# Altium PCB PCI Express Mini_3000X5095_52PIN_Full-Mini-Type F1.PCBDOC (part 2 of 8)
Units mm, origin at the board's own origin, x right, y up, seen from the top; angles counter-clockwise.
Board outline 70 x 83.2 mm, 6 copper layers (TopLayer, Layer 1, Layer 2, Layer 3, Layer 4, Bottom Layer), stack 0.914 mm thick; 380 components, 252 nets, 1258 pads, 603 vias.
Unrouted connection lines stored in the file: 10.
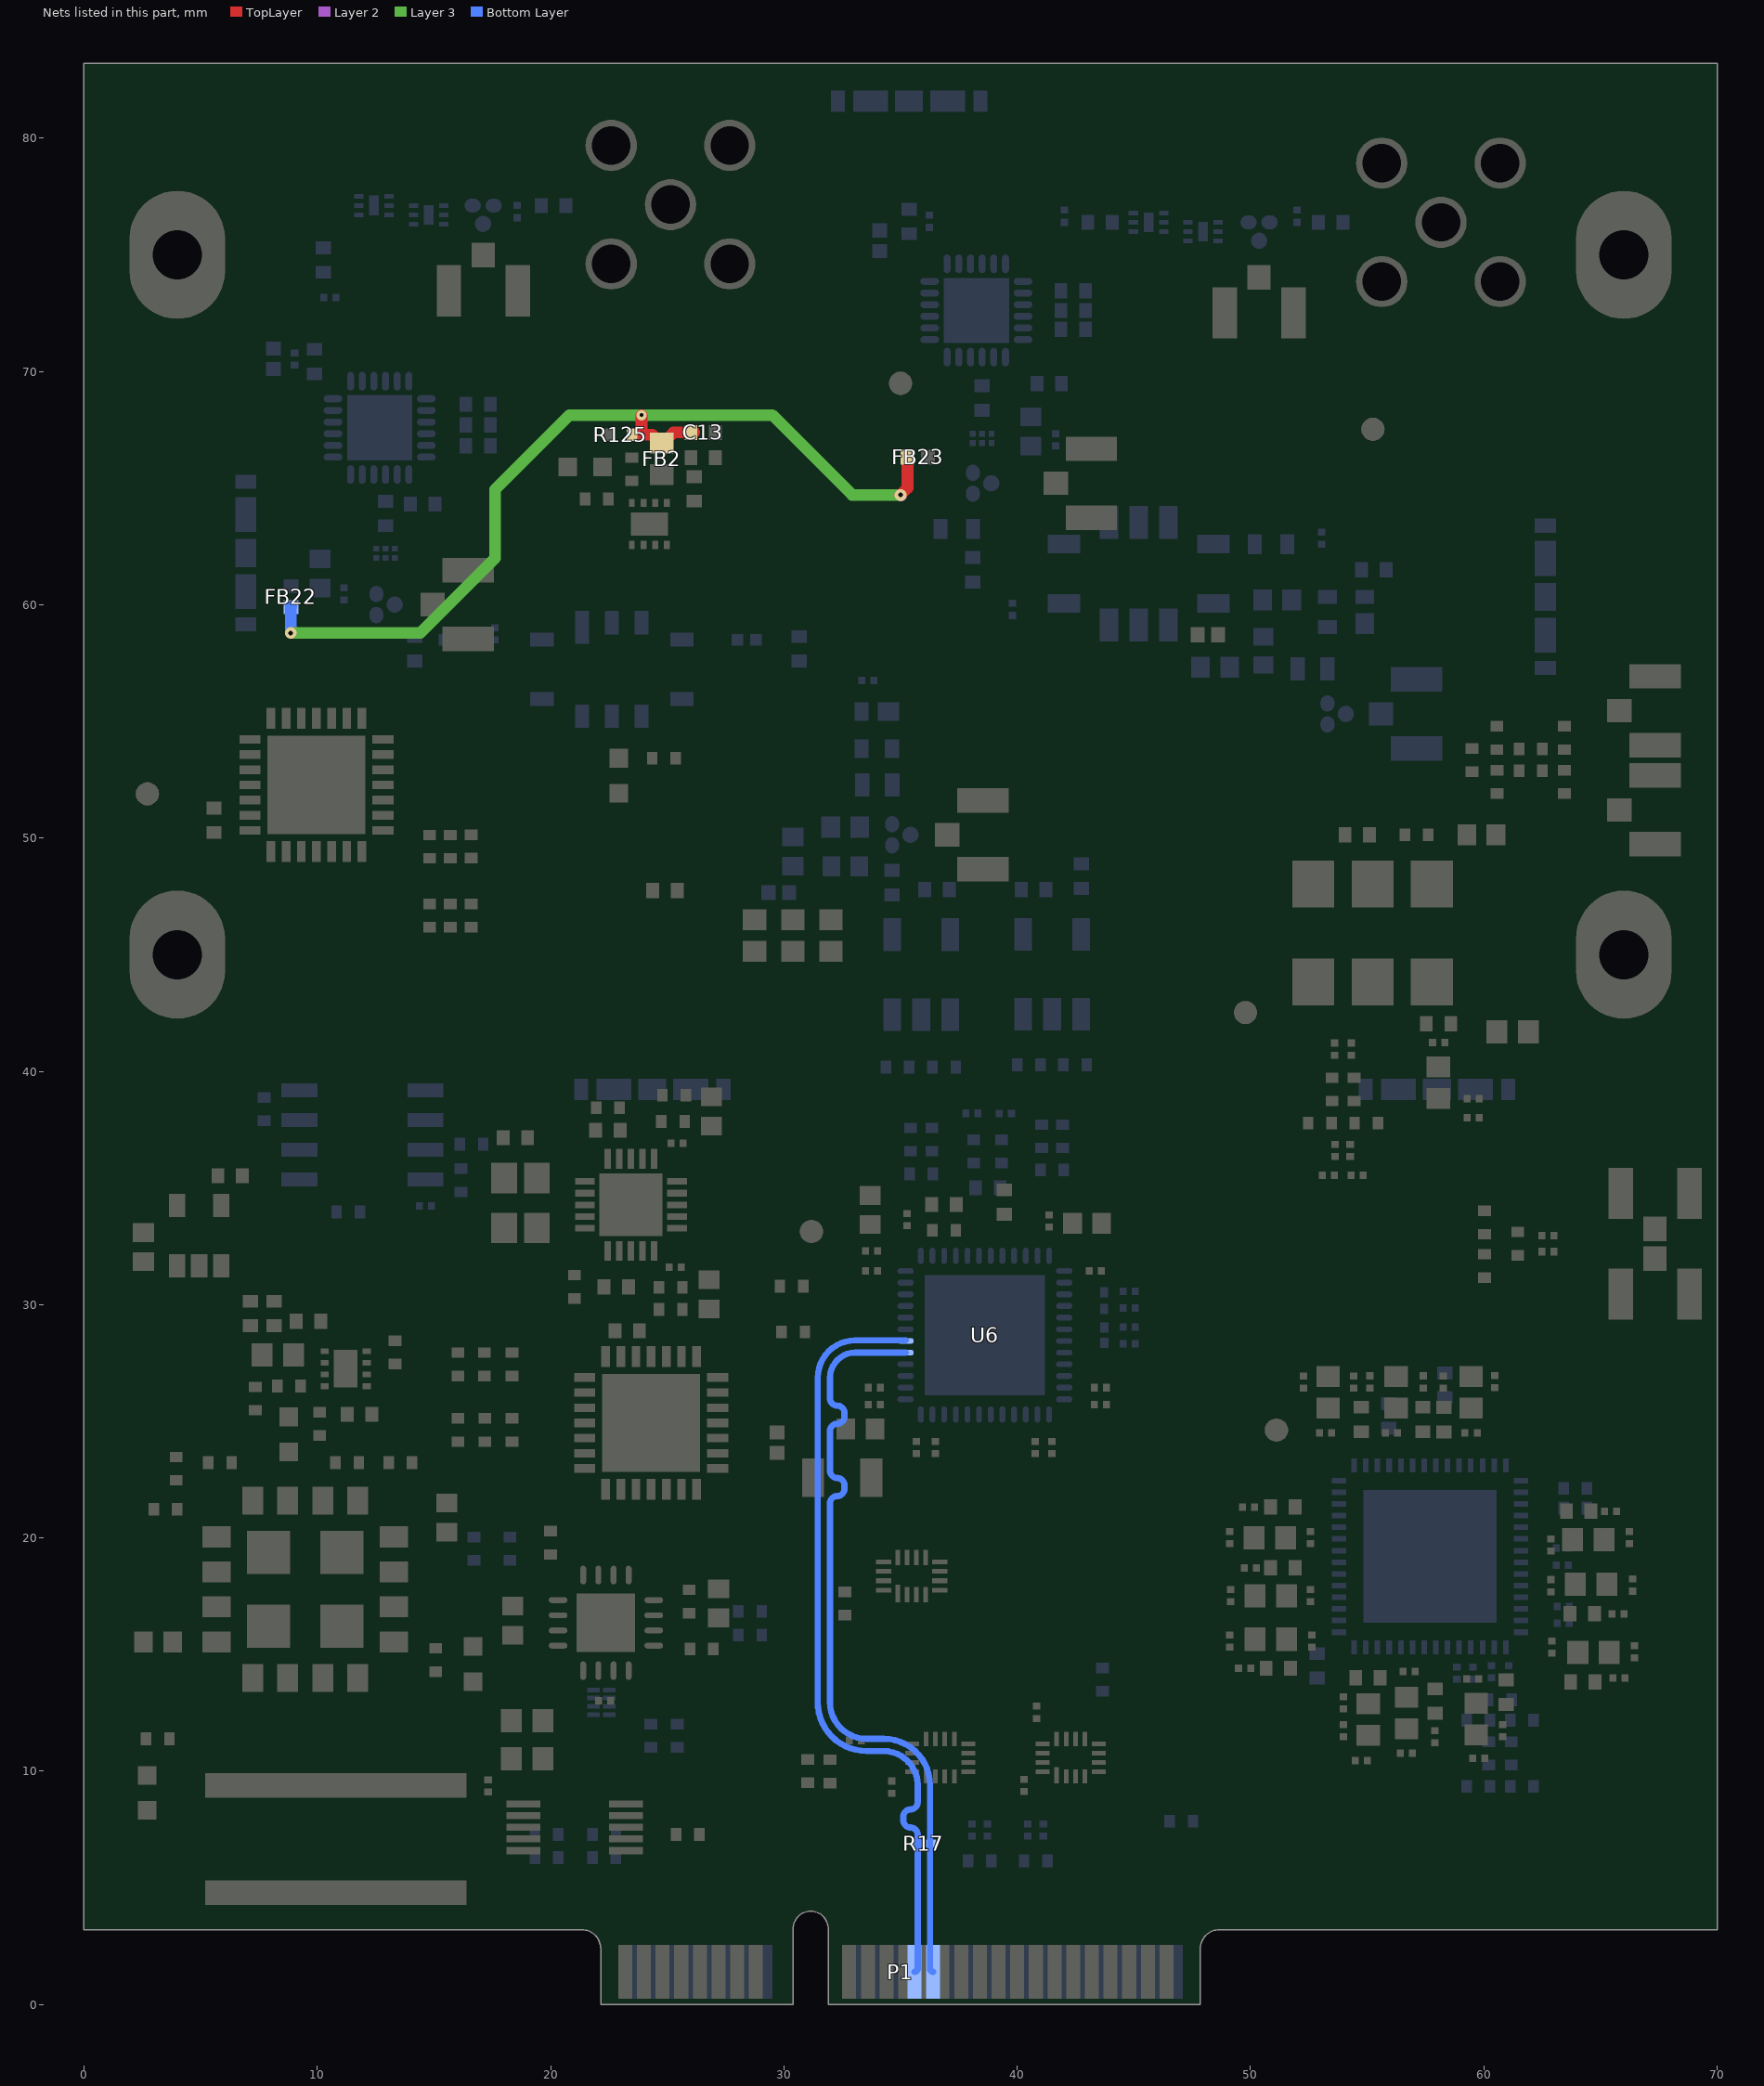
[diagram p6: the nets of this part, all layers, seen from the top]

## Footprints (in the part's own frame and the unit in brackets; to place one, negate y for a bottom-side part, rotate by r counter-clockwise, add the part's x,y. Pads: shape width x height; smd on the part's side, far side on the other; paste and mask are expansions set on the pad) (continued)
LTC2122 [mm] "LTC2122, QFN, 48-Leads, Body 7,00x7,00mm, Pitch 0,50mm, Thermal Pad 5,15x5,15mm, IPC Medium Density"
  oval 0.7x0.25 smd: 1(-3.4,2.75) 2(-3.4,2.25) 3(-3.4,1.75) 4(-3.4,1.25) 5(-3.4,0.75) 6(-3.4,0.25) 7(-3.4,-0.25) 8(-3.4,-0.75) 9(-3.4,-1.25) 10(-3.4,-1.75) 11(-3.4,-2.25) 12(-3.4,-2.75) 25(3.4,-2.75) 26(3.4,-2.25) 27(3.4,-1.75) 28(3.4,-1.25) 29(3.4,-0.75) 30(3.4,-0.25) 31(3.4,0.25) 32(3.4,0.75) 33(3.4,1.25) 34(3.4,1.75) 35(3.4,2.25) 36(3.4,2.75)
  oval 0.25x0.7 smd: 13(-2.75,-3.4) 14(-2.25,-3.4) 15(-1.75,-3.4) 16(-1.25,-3.4) 17(-0.75,-3.4) 18(-0.25,-3.4) 19(0.25,-3.4) 20(0.75,-3.4) 21(1.25,-3.4) 22(1.75,-3.4) 23(2.25,-3.4) 24(2.75,-3.4) 37(2.75,3.4) 38(2.25,3.4) 39(1.75,3.4) 40(1.25,3.4) 41(0.75,3.4) 42(0.25,3.4) 43(-0.25,3.4) 44(-0.75,3.4) 45(-1.25,3.4) 46(-1.75,3.4) 47(-2.25,3.4) 48(-2.75,3.4)
  rect 5.15x5.15 smd: 49(0,0)
  silkscreen extent -4.42,-3.65 3.65,3.65, body extent -3.7,-3.7 3.7,3.7, height 0.8
MABA-007159-000000 [mm]
  rect 1.4x0.76 smd: 1(-1.715,-1.25) 2(-1.715,0) 3(-1.715,1.25) 4(1.715,1.25) 5(1.715,-1.25)
  silkscreen extent -2.92,-2.03 2.79,1.9, body extent -2.69,-1.9 2.69,1.9, height 3.24
MCP23017/MCP23S17 [mm] "QFN, 28-Leads, Body 6,00x6,00mm, Pitch 0,65mm, Thermal Pad 4,25x4,25mm, IPC High Density"
  rect 0.9x0.37 smd: 1(-2.85,1.95) 2(-2.85,1.3) 3(-2.85,0.65) 4(-2.85,0) 5(-2.85,-0.65) 6(-2.85,-1.3) 7(-2.85,-1.95) 15(2.85,-1.95) 16(2.85,-1.3) 17(2.85,-0.65) 18(2.85,0) 19(2.85,0.65) 20(2.85,1.3) 21(2.85,1.95)
  rect 0.37x0.9 smd: 8(-1.95,-2.85) 9(-1.3,-2.85) 10(-0.65,-2.85) 11(0,-2.85) 12(0.65,-2.85) 13(1.3,-2.85) 14(1.95,-2.85) 22(1.95,2.85) 23(1.3,2.85) 24(0.65,2.85) 25(0,2.85) 26(-0.65,2.85) 27(-1.3,2.85) 28(-1.95,2.85)
  rect 4.2x4.2 smd: 29(0,0)
  silkscreen extent -3.92,-3.15 3.15,3.15, body extent -3,-3 3,3, height 1
ODS-1415 [mm]
  rect 0.4x0.2 smd: 1(-0.65,0.4) 2(-0.65,0) 3(-0.65,-0.4) 4(0.65,-0.4) 5(0.65,0) 6(0.65,0.4)
  rect 0.42x0.85 smd: 7(0,0)
  silkscreen extent -1.11,0.66 -1.01,0.76, body extent -0.75,-0.6 0.75,0.6, height 0.6
PCA9306 [mm] "8-XFDFN, Body 1,40x1,00mm, Pitch 0,35mm, IPC High Density"
  rect 0.53x0.2 smd: 1(-0.335,0.525) 2(-0.335,0.175) 3(-0.335,-0.175) 4(-0.335,-0.525) 5(0.335,-0.525) 6(0.335,-0.175) 7(0.335,0.175) 8(0.335,0.525)
  silkscreen extent -0.86,0.79 -0.76,0.89, body extent -0.53,-0.72 0.53,0.72, height 0.4
PCIeMini-GF-2D-800-1K-S52 [mm] "Golden finger, PCIeMini, Dual, Staggered, Pitch 0.8mm, 52-Position"
  rect 0.6x2.3 smd paste-0.9: 1(-11.8,0) 3(-11,0) 5(-10.2,0) 7(-9.4,0) 9(-8.6,0) 11(-7.8,0) 13(-7,0) 15(-6.2,0) 17(-2.2,0) 19(-1.4,0) 21(-0.6,0) 23(0.2,0) 25(1,0) 27(1.8,0) 29(2.6,0) 31(3.4,0) 33(4.2,0) 35(5,0) 37(5.8,0) 39(6.6,0) 41(7.4,0) 43(8.2,0) 45(9,0) 47(9.8,0) 49(10.6,0) 51(11.4,0)
  rect 0.6x2.3 smd far side paste-0.9: 2(-11.4,0) 4(-10.6,0) 6(-9.8,0) 8(-9,0) 10(-8.2,0) 12(-7.4,0) 14(-6.6,0) 16(-5.8,0) 18(-1.8,0) 20(-1,0) 22(-0.2,0) 24(0.6,0) 26(1.4,0) 28(2.2,0) 30(3,0) 32(3.8,0) 34(4.6,0) 36(5.4,0) 38(6.2,0) 40(7,0) 42(7.8,0) 44(8.6,0) 46(9.4,0) 48(10.2,0) 50(11,0) 52(11.8,0)
QCC12B [mm] "Ceramic package QCC12B"
  rect 0.6x1.4 smd: 1(-1.27,-1.8)
  rect 0.6x1 smd: 2(0,-2) 3(1.27,-2) 7(1.27,2) 8(0,2) 9(-1.27,2)
  rect 1x0.6 smd: 4(3,-1.27) 6(3,1.27) 10(-3,1.27) 12(-3,-1.27)
  silkscreen extent -3.5,-3.17 3.5,2.5, body extent -3.5,-2.5 3.5,2.5, height 1.5
"RES 0201/0603"#1 [mm] "Chip Resistor, 2-Leads, Body 0.60x0.30mm, IPC Medium Density"
  rect 0.44x0.35 smd: 1(-0.325,0) 2(0.325,0)
  silkscreen extent -0.7,-0.33 0.7,0.33, body extent -0.3,-0.15 0.3,0.15, height 0.21
"RES 0201/0603"#2 [mm] "Chip Resistor, 2-Leads, Body 0.60x0.30mm, IPC Medium Density"
  rect 0.44x0.35 smd: 1(-0.325,0) 2(0.394,0)
  silkscreen extent -0.7,-0.33 0.7,0.33, body extent -0.3,-0.15 0.3,0.15, height 0.21
"RES 0402/1005 RF - 3-PADS" [mm] "Chip Resistor, 2-Leads, Body 1.0x0.5mm, IPC High Density"
  oval 0.7x0.6 smd: 1(-0.45,0) 2(0.45,0)
  round 0.7 smd: 3(0,0.787)
  silkscreen extent -1.02,-0.5 1.02,1.34, body extent -0.5,-0.25 0.5,0.25, height 0.35
"RES 0402/1005 RF KK" [mm] "Chip Resistor, 2-Leads, Body 1.0x0.5mm, IPC High Density"
  rect 0.45x0.55 smd: 1(-0.5,0) 2(0.5,0)
  silkscreen extent -1.02,-0.51 1.02,0.51, body extent -0.5,-0.25 0.5,0.25, height 0.35
"RES 0603/1608 RF" [mm]
  rect 0.75x0.85 smd: 1(-0.6,0) 2(0.6,0)
  silkscreen extent -1.2,-0.6 1.2,0.6, body extent -0.8,-0.4 0.8,0.4, height 0.45
ROS-32K101-400L5_V [mm] "SMA Straight Jack, 6.35x6.35x9.5mm, Rosenberger Recommended"
  round 2.2 hole 1.65: 1(0,0) MH(-2.54,2.54) MH(-2.54,-2.54) MH(2.54,2.54) MH(2.54,-2.54)
  silkscreen extent -3.17,-3.18 3.18,3.17, body extent -3.17,-3.17 3.18,3.18, height 9.5
TB0787A [mm] "TB0787A MP02661"
  rect 0.8x1.4 smd: A(-1.27,-2.2) B(0,-2.2) C(1.27,-2.2) F(1.27,2.2) G(0,2.2) H(-1.27,2.2)
  rect 1.4x0.8 smd: D(3.2,-1.27) E(3.2,1.27) J(-3.2,1.27) K(-3.2,-1.27)
  silkscreen extent -3.6,-3.55 3.6,2.6, body extent -3.5,-2.5 3.5,2.5, height 1.7
TECO-1909763-1_V [mm] "SMD, 3-Leads, Body 2.6x2.6mm, Height 1.25mm"
  rect 1.05x2.2 smd: 1(-1.475,0) 3(1.475,0)
  rect 1x1.05 smd: 2(0,-1.525)
  silkscreen extent -1.9,-1.77 0.55,1.3, body extent -1.5,-1.55 1.5,1.55, height 1.25
TPS7A88 [mm] "RTJ (S-PWQFN-N20) 20-Leads, Body 4,00x4,00mm, Pitch 0,50mm, Thermal Pad 2,70x2,70mm, IPC High Density"
  rect 0.85x0.28 smd: 1(-1.975,1) 2(-1.975,0.5) 3(-1.975,0) 4(-1.975,-0.5) 5(-1.975,-1) 11(1.975,-1) 12(1.975,-0.5) 13(1.975,0) 14(1.975,0.5) 15(1.975,1)
  rect 0.28x0.85 smd: 6(-1,-1.975) 7(-0.5,-1.975) 8(0,-1.975) 9(0.5,-1.975) 10(1,-1.975) 16(1,1.975) 17(0.5,1.975) 18(0,1.975) 19(-0.5,1.975) 20(-1,1.975)
  rect 2.7x2.7 smd paste-3: 21(0,0)
  silkscreen extent -2.85,-2.07 2.07,2.07, body extent -2.07,-2.07 2.07,2.07, height 0.8
TSNP-6-10-FP [mm]
  rect 0.25x0.25 smd: 1(-0.2,0.4) 2(-0.2,0) 3(-0.2,-0.4) 4(0.2,-0.4) 5(0.2,0) 6(0.2,0.4)
  silkscreen extent -0.39,0.8 -0.29,0.9, body extent -0.4,-0.55 0.4,0.55, height 0.37
TXB0304 [mm] "RSV0016A UQFN - 0.55 mm max height"
  rect 0.75x0.2 smd: 1(-0.75,0.6)
  rect 0.65x0.2 smd: 2(-0.8,0.2) 3(-0.8,-0.2) 4(-0.8,-0.6) 9(0.8,-0.6) 10(0.8,-0.2) 11(0.8,0.2) 12(0.8,0.6)
  rect 0.2x0.65 smd: 5(-0.6,-1.2) 6(-0.2,-1.2) 7(0.2,-1.2) 8(0.6,-1.2) 13(0.6,1.2) 14(0.2,1.2) 15(-0.2,1.2) 16(-0.6,1.2)
  silkscreen extent -1.27,1.58 -1.18,1.67, body extent -0.92,-1.33 0.92,1.33, height 0.55
VG-4513CA [mm] "VG-4513CA, Concave, 6-Leads, Pitch 2,54mm,  Body 7,00x5,00mm,  IPC Medium Density"
  rect 2x1.8 smd: 1(-2.1,2.54) 2(-2.1,0) 3(-2.1,-2.54) 4(2.1,-2.54) 5(2.1,0) 6(2.1,2.54)
  silkscreen extent -3.26,3.28 -3.16,3.38, body extent -2.55,-3.5 2.55,3.5, height 1.6
WE-KI_0603 [mm] "SMD Wire Wound Ceramic Inductor, body 1.6x1.05mm"
  rect 0.625x1 smd: 1(-0.637,0) 2(0.637,0)
  body extent -0.82,-0.58 0.83,0.58, height 0.92

## Part data
C1 C2 C38 C75 C76 C91: library part Capacitor, "TAIYO YUDEN - EMK107ABJ475MA-T - SMD Multilayer Ceramic Capacitor, 4.7 µF, 16 V, 0603 [1608 Metric], ± 20%, X5R, M Series", Case/Package=Ceramic, Dielectric=X5R, Manufacturer="Taiyo Yuden", Manufacturer Part Number=EMK107ABJ475MA-T, Max Operating Temperature=85°C, Min Operating Temperature=-55°C, Supplier Part Number 1=587-6003-1-ND, Tolerance=20%, Voltage=16V, Capacitance=4.7uF, Category="Ceramic Capacitors", ComponentLink1Description=https://datasheet.ciiva.com/26871/getdatasheetpartid-637315-26871304.pdf?src-supplier=Verical, ComponentLink1URL=https://datasheet.ciiva.com/26871/getdatasheetpartid-637315-26871304.pdf?src-supplier=Verical, Depth=0.8mm, Height=0.8mm, Lead Free="Lead Free", Length=1.6mm, Mount="Surface Mount", Packaging="Tape and Reel", Pricing 1="1=0,28000, 10=0,19200, 50=0,12820, 100=0,10900, 500=0,07696, 1000=0,06734 (USD)", Radiation Hardening=No, RoHS=Yes, Stock 1=5, Supplier 1=Digi-Key
C3: library part Capacitor, Case Code (Imperial)=0603, Case Code (Metric)=1608, Dielectric=X5R, Manufacturer 1=Samsung, Manufacturer Part Number 1=CL10A105KA8NNNC, Max Operating Temperature=85°C, Min Operating Temperature=-55°C, Package Quantity=1, Supplier Part Number 1=1276-1102-1-ND, Tolerance=10%, Voltage=25V, Capacitance=1uF, Case/Package=0603, ComponentLink1Description=https://datasheet.ciiva.com/25801/cl10a105ka8nnnc-25801364.pdf?src-supplier=Digi-Key, ComponentLink1URL=https://datasheet.ciiva.com/25801/cl10a105ka8nnnc-25801364.pdf?src-supplier=Digi-Key, ComponentLink2Description=https://datasheet.ciiva.com/26838/getdatasheetpartid-357530-26838332.pdf?src-supplier=Verical, ComponentLink2URL=https://datasheet.ciiva.com/26838/getdatasheetpartid-357530-26838332.pdf?src-supplier=Verical, ComponentLink3Description=https://datasheet.ciiva.com/29198/458162-da-01-en-vs-kondensator-0603-29198475.pdf?src-supplier=Conrad, ComponentLink3URL=https://datasheet.ciiva.com/29198/458162-da-01-en-vs-kondensator-0603-29198475.pdf?src-supplier=Conrad, Contact Plating=Tin, Depth=0.8mm, Height=0.8mm, Lead Free="Lead Free", Length=1.6mm, Material=Ceramic, Mount="Surface Mount", Packaging="Tape and Reel", Pricing 1="1=0.10000, 10=0.04100, 100=0.01850, 500=0.01320, 1000=0.01037 (USD)", Radiation Hardening=No, RoHS=Yes, Stock 1=3421596, Supplier 1=Digi-Key, Thickness=0.035inch, Voltage Rating=25V, Voltage Rating (DC)=25V, Width=0.031inch
C4 C65 C73 C74: library part Capacitor, "MURATA - GRM155R61A225KE95D - Keramikvielschichtkondensator, SMD, 2.2 µF, 10 V, 0402 [Metrisch 1005], ± 10%, X5R, Baureihe GRM", Case Code (Imperial)=0402, Case Code (Metric)=1005, Dielectric=X5R, Manufacturer=Murata, Manufacturer Part Number=GRM155R61A225KE95D, Max Operating Temperature=85°C, Min Operating Temperature=-55°C, Package Quantity=10000, Supplier Part Number 1=490-10451-1-ND, Tolerance=10%, Voltage Rating=10V, Capacitance=2.2uF, Case/Package=0402, Category="Ceramic Capacitors", ComponentLink1Description=http://www.mouser.com/ds/2/281/c02e-2905.pdf?src-supplier=Mouser, ComponentLink1URL=http://www.mouser.com/ds/2/281/c02e-2905.pdf?src-supplier=Mouser, ComponentLink2Description=http://components.arrow.com/part/dataview/0323_04264073?src-supplier=Arrow+Europe, ComponentLink2URL=http://components.arrow.com/part/dataview/0323_04264073?src-supplier=Arrow+Europe, ComponentLink3Description=http://www.farnell.com/datasheets/1872202.pdf?src-supplier=Farnell, ComponentLink3URL=http://www.farnell.com/datasheets/1872202.pdf?src-supplier=Farnell, ComponentLink4Description=http://www.farnell.com/datasheets/2047915.pdf?src-supplier=Farnell, ComponentLink4URL=http://www.farnell.com/datasheets/2047915.pdf?src-supplier=Farnell, ComponentLink5Description=http://www.farnell.com/datasheets/1872202.pdf?src-supplier=Element14, ComponentLink5URL=http://www.farnell.com/datasheets/1872202.pdf?src-supplier=Element14, ComponentLink6Description=http://www.farnell.com/datasheets/1872202.pdf?src-supplier=Newark, ComponentLink6URL=http://www.farnell.com/datasheets/1872202.pdf?src-supplier=Newark, ComponentLink7Description=http://psearch.en.murata.com/capacitor/product/GRM155R61A225KE95%23.pdf?src-supplier=Avnet, ComponentLink7URL=http://psearch.en.murata.com/capacitor/product/GRM155R61A225KE95%23.pdf?src-supplier=Avnet, ComponentLink8Description=http://www.farnell.com/datasheets/2047915.pdf?src-supplier=Element14, ComponentLink8URL=http://www.farnell.com/datasheets/2047915.pdf?src-supplier=Element14, ComponentLink9Description=https://search.murata.co.jp/Ceramy/image/img/A01X/G101/ENG/GRM155R61A225KE95-01.pdf?src-supplier=Digi-Key, ComponentLink9URL=https://search.murata.co.jp/Ceramy/image/img/A01X/G101/ENG/GRM155R61A225KE95-01.pdf?src-supplier=Digi-Key, ComponentLink10Description=http://www.farnell.com/datasheets/2047915.pdf?src-supplier=Newark, ComponentLink10URL=http://www.farnell.com/datasheets/2047915.pdf?src-supplier=Newark, Depth=0.5mm, Height=0.5mm, Lead Free="Lead Free", Length=1mm, Material=Ceramic, Mount="Surface Mount", Packaging="Tape and Reel", REACH SVHC="No SVHC", RoHS=Yes, Supplier 1=Digi-Key, Termination=SMD/SMT, Thickness=0.022inch, Voltage Rating (DC)=10V, Weight=0.000212oz, Width=0.5mm
  C4: Pricing 1="1=0,11000, 10=0,07700, 50=0,04380, 100=0,03630, 500=0,02546, 1000=0,02108, 2500=0,01962, 5000=0,01795 (USD)", Stock 1=502318
  C65 C73 C74: Pricing 1="1=0,11000, 10=0,08100, 100=0,03800, 500=0,02664, 1000=0,02205, 2500=0,02052, 5000=0,01878 (USD)", Stock 1=2215146
C5 C42: library part Capacitor, Case Code (Imperial)=0402, Case Code (Metric)=1005, Dielectric=C0G, Dielectric Material=Ceramic, Manufacturer 1=KEMET, Manufacturer Part Number 1=C0402C101J5GACAUTO, Max Operating Temperature=125°C, Min Operating Temperature=-55°C, Package Quantity=10000, Ratings=AEC-Q200, Supplier Part Number 1=399-6823-1-ND, Tolerance=5%, Voltage Rating=50V, Capacitance=100pF, Case/Package=0402, ComponentLink1Description=https://datasheet.ciiva.com/26923/getdatasheetpartid-385375-26923866.pdf?src-supplier=Verical, ComponentLink1URL=https://datasheet.ciiva.com/26923/getdatasheetpartid-385375-26923866.pdf?src-supplier=Verical, Depth=0.5mm, Lead Free="Lead Free", Length=1mm, Mount="Surface Mount", Packaging="Tape and Reel", Pricing 1="1=0.11000, 10=0.08400, 100=0.03730, 500=0.02664, 1000=0.02093, 2500=0.01903, 5000=0.01751 (USD)", Radiation Hardening=No, REACH SVHC="No SVHC", RoHS=Yes, Stock 1=66452, Supplier 1=Digi-Key, Thickness=0.022inch, Voltage Rating (DC)=50V, Width=0.02inch
C6 C7 C10 C11 C67 C68: library part Capacitor, "MURATA - GRT155R61E105KE01D - SMD Multilayer Ceramic Capacitor, 1 µF, 25 V, 0402 [1005 Metric], ± 10%, X5R, GRT Series - SMD Multilayer Ceramic Capacitor, 1 µF, 25 V, 0402 [1005 Metric], ± 10%, X5R, GRT Series", Case Code (Imperial)=0402, Case Code (Metric)=1005, Dielectric=X5R, Manufacturer=Murata, Manufacturer Part Number=GRT155R61E105KE01D, Max Operating Temperature=85°C, Min Operating Temperature=-55°C, Ratings=AEC-Q200, Supplier Part Number 1=490-12263-1-ND, Tolerance=10%, Voltage Rating=25V, Capacitance=1uF, Case/Package=0402, Category="Ceramic Capacitors", ComponentLink1Description=http://www.farnell.com/datasheets/2165918.pdf?src-supplier=Farnell, ComponentLink1URL=http://www.farnell.com/datasheets/2165918.pdf?src-supplier=Farnell, ComponentLink2Description=http://search.murata.co.jp/Ceramy/image/img/A01X/G101/ENG/GRT155R61E105KE01-01.pdf?src-supplier=Digi-Key, ComponentLink2URL=http://search.murata.co.jp/Ceramy/image/img/A01X/G101/ENG/GRT155R61E105KE01-01.pdf?src-supplier=Digi-Key, ComponentLink3Description=http://www.farnell.com/datasheets/2165918.pdf?src-supplier=Element14, ComponentLink3URL=http://www.farnell.com/datasheets/2165918.pdf?src-supplier=Element14, Length=0.039inch, Mount="Surface Mount", Packaging="Tape and Reel", Pricing 1="1=0,18000, 10=0,12300, 100=0,06210, 500=0,04248, 1000=0,03758, 2500=0,03594, 5000=0,03268 (USD)", RoHS=Yes, Stock 1=341453, Supplier 1=Digi-Key, Thickness=0.022inch, Voltage Rating (DC)=25V, Width=0.02inch
C8 C9 C12 C13: library part Capacitor, Case Code (Imperial)=0402, Case Code (Metric)=1005, Manufacturer 1=Murata, Manufacturer Part Number 1=GRM155R61A475MEAAD, Max Operating Temperature=85°C, Min Operating Temperature=-55°C, Supplier Part Number 1=490-14306-1-ND, Tolerance=20%, Voltage Rating=10V, Capacitance=4.7uF, Case/Package=0402, ComponentLink1Description=http://www.farnell.com/datasheets/2189109.pdf?src-supplier=Farnell, ComponentLink1URL=http://www.farnell.com/datasheets/2189109.pdf?src-supplier=Farnell, ComponentLink2Description=https://search.murata.co.jp/Ceramy/image/img/A01X/G101/ENG/GRM155R61A475MEAA-01.pdf?src-supplier=Digi-Key, ComponentLink2URL=https://search.murata.co.jp/Ceramy/image/img/A01X/G101/ENG/GRM155R61A475MEAA-01.pdf?src-supplier=Digi-Key, ComponentLink3Description=http://datasheet.octopart.com/GRM155R61A475MEAAD-Murata-datasheet-68589269.pdf?src-supplier=Newark, ComponentLink3URL=http://datasheet.octopart.com/GRM155R61A475MEAAD-Murata-datasheet-68589269.pdf?src-supplier=Newark, ComponentLink4Description=http://datasheet.octopart.com/GRM155R61A475MEAAD-Murata-datasheet-8819587.pdf, ComponentLink4URL=http://datasheet.octopart.com/GRM155R61A475MEAAD-Murata-datasheet-8819587.pdf, ComponentLink5Description=http://datasheet.octopart.com/GRM155R61A475MEAAD-Murata-datasheet-10025737.pdf, ComponentLink5URL=http://datasheet.octopart.com/GRM155R61A475MEAAD-Murata-datasheet-10025737.pdf, ComponentLink6Description=http://datasheet.octopart.com/GRM155R61A475MEAAD-Murata-datasheet-11978611.pdf, ComponentLink6URL=http://datasheet.octopart.com/GRM155R61A475MEAAD-Murata-datasheet-11978611.pdf, ComponentLink7Description=http://datasheet.octopart.com/GRM155R61A475MEAAD-Murata-datasheet-12510076.pdf, ComponentLink7URL=http://datasheet.octopart.com/GRM155R61A475MEAAD-Murata-datasheet-12510076.pdf, ComponentLink8Description=http://datasheet.octopart.com/GRM155R61A475MEAAD-Murata-datasheet-12515295.pdf, ComponentLink8URL=http://datasheet.octopart.com/GRM155R61A475MEAAD-Murata-datasheet-12515295.pdf, Mount="Surface Mount", Packaging="Tape and Reel", Pricing 1="1=0.23000, 10=0.15400, 100=0.07780, 500=0.05322, 1000=0.04708, 2500=0.04504, 5000=0.04094 (USD)", Stock 1=1535315, Supplier 1=Digi-Key
C14 C15 C40 C41 C43 C44 C46 C47 C50 C51 C52 C53 C54 C55 C56 C57 C58 C59 C62 C66 C70 C71 C77 C78 C79 C80 C81 C82 C83 C84 C85 C88 C89 C90 C93 C94 C95 C97 C98 C99 C101 C102 C103 C105 C106 C107 C109 C110 C111 C113 C114 C115 C117 C118 C119 C121 C122 C123 C125 C126 C127 C131 C132 C133 C135 C136 C137 C143 C144 C145 C147 C148 C149 C153 C154 C166 C177 C179 C180_U_ATT1 C180_U_ATT2 C192 C193: library part Capacitor, Case Code (Imperial)=0201, Case Code (Metric)=0603, Dielectric=X5R, Manufacturer 1=Murata, Manufacturer Part Number 1=GRM033R61C104ME84D, Max Operating Temperature=85°C, Min Operating Temperature=-55°C, Package Quantity=15000, Supplier Part Number 1=490-9986-1-ND, Tolerance=20%, Voltage Rating=16V, Capacitance=100nF, Case/Package=0201, ComponentLink1Description=http://www.mouser.com/ds/2/281/c02e-2905.pdf?src-supplier=Mouser, ComponentLink1URL=http://www.mouser.com/ds/2/281/c02e-2905.pdf?src-supplier=Mouser, ComponentLink2Description=http://search.murata.co.jp/Ceramy/image/img/A01X/G101/ENG/GRM033R61C104ME84-01.pdf?src-supplier=Digi-Key, ComponentLink2URL=http://search.murata.co.jp/Ceramy/image/img/A01X/G101/ENG/GRM033R61C104ME84-01.pdf?src-supplier=Digi-Key, Height=0.3mm, Length=0.024inch, Mount="Surface Mount", Packaging="Tape and Reel", Pricing 1="1=0.10000, 10=0.05400, 100=0.02430, 500=0.01732, 1000=0.01361, 2500=0.01238, 5000=0.01139 (USD)", RoHS=Yes, Supplier 1=Digi-Key, Termination=SMD/SMT, Thickness=0.013inch, Voltage Rating (DC)=16V, Weight=1.2E-05oz, Width=0.3mm
  C14 C15 C40 C41 C43 C44 C46 C47 C50 C51 C52 C53 C54 C55 C56 C57 C58 C59 C62 C66 C70 C71 C77 C78 C79 C80 C81 C82 C83 C84 C85 C88 C89 C90 C93 C94 C95 C97 C98 C99 C101 C102 C103 C105 C106 C107 C109 C110 C111 C113 C114 C115 C117 C118 C119 C121 C122 C123 C125 C126 C127 C131 C132 C133 C135 C136 C137 C143 C144 C145 C147 C148 C149 C153 C154 C166 C177 C179 C192 C193: Stock 1=503570
  C180_U_ATT1 C180_U_ATT2: Stock 1=550070
C35 C36 C37 C96 C100 C104 C108 C112 C116 C120 C124 C128 C134 C138 C146 C150 C181_U_ATT1 C181_U_ATT2: library part Capacitor, "CAP CER 10UF 6.3V X5R 0402", Case Code (Imperial)=0402, Case Code (Metric)=1005, Manufacturer=Murata, Manufacturer Part Number=GRJ155R60J106ME11D, Max Operating Temperature=85°C, Min Operating Temperature=-55°C, Supplier Part Number 1=490-13211-1-ND, Tolerance=20%, Voltage Rating=6.3V, Capacitance=10uF, Case/Package=0402, Category="Ceramic Capacitors", ComponentLink1Description=http://psearch.en.murata.com/capacitor/product/GRJ155R60J106ME11%23.pdf?src-supplier=Digi-Key, ComponentLink1URL=http://psearch.en.murata.com/capacitor/product/GRJ155R60J106ME11%23.pdf?src-supplier=Digi-Key, Features="Soft Termination", Length=0.039inch, Mount="Surface Mount", Packaging="Cut Tape", Pricing 1="1=0,21000, 10=0,14500, 50=0,08680, 100=0,07330, 500=0,05016, 1000=0,04436, 2500=0,04244, 5000=0,03858 (USD)", RoHS=Yes, Stock 1=1136490, Supplier 1=Digi-Key, Thickness=0.028inch, Width=0.02inch
C39 C45: library part Capacitor, Case Code (Imperial)=0201, Case Code (Metric)=0603, Dielectric=X5R, Manufacturer 1=Yageo, Manufacturer Part Number 1=CC0201KRX5R6BB104, Max Operating Temperature=85°C, Min Operating Temperature=-55°C, Supplier Part Number 1=311-1593-1-ND, Tolerance=10%, Voltage Rating=10V, Capacitance=100nF, Case/Package=0201, ComponentLink1Description=https://datasheet.ciiva.com/17437/upy-gphc-x5r-4v-to-50v-12-17437495.pdf?src-supplier=Avnet+Europe, ComponentLink1URL=https://datasheet.ciiva.com/17437/upy-gphc-x5r-4v-to-50v-12-17437495.pdf?src-supplier=Avnet+Europe, ComponentLink2Description=https://datasheet.ciiva.com/11587/upy-gphc-x5r-4v-to-50v-12-11587190.pdf?src-supplier=Avnet, ComponentLink2URL=https://datasheet.ciiva.com/11587/upy-gphc-x5r-4v-to-50v-12-11587190.pdf?src-supplier=Avnet, Composition=Ceramic, Depth=0.3mm, Halogen Free="Halogen Free", Height=0.3mm, Lead Free="Lead Free", Length=0.6mm, Mount="Surface Mount", Packaging="Tape and Reel", Pricing 1="1=0.10000, 10=0.03800, 100=0.01690, 500=0.01208, 1000=0.00949, 2500=0.00862, 5000=0.00794 (USD)", Radiation Hardening=No, RoHS=Yes, Stock 1=1229391, Supplier 1=Digi-Key, Termination=SMD/SMT, Thickness=0.013inch, Voltage Rating (DC)=10V, Weight=6E-06oz, Width=0.012inch
C48: library part Capacitor, "0402 16V X7R 0.1uF 5% multilayer ceramic capacitor", Case/Package=0402, Dielectric=X7R, Manufacturer=Murata, Manufacturer Part Number=GCM155R71C104JA55D, Max Operating Temperature=125°C, Min Operating Temperature=-55°C, Supplier Part Number 1=490-16433-1-ND, Tolerance=5%, Capacitance=100nF, Category="Ceramic Capacitors", ComponentLink1Description=http://components.arrow.com/part/dataview/0323_06691671?src-supplier=Arrow+Europe, ComponentLink1URL=http://components.arrow.com/part/dataview/0323_06691671?src-supplier=Arrow+Europe, ComponentLink2Description=http://search.murata.co.jp/Ceramy/image/img/A01X/G101/ENG/GCM155R71C104JA55-01.pdf?src-supplier=Digi-Key, ComponentLink2URL=http://search.murata.co.jp/Ceramy/image/img/A01X/G101/ENG/GCM155R71C104JA55-01.pdf?src-supplier=Digi-Key, ComponentLink3Description=https://search.murata.co.jp/Ceramy/image/img/A01X/G101/ENG/GCM155R71C104JA55-01.pdf?src-supplier=Digi-Key, ComponentLink3URL=https://search.murata.co.jp/Ceramy/image/img/A01X/G101/ENG/GCM155R71C104JA55-01.pdf?src-supplier=Digi-Key, Depth=0.5mm, Length=1mm, Packaging="Tape and Reel", Pricing 1="1=0,10000, 10=0,05500, 50=0,02980, 100=0,02430, 500=0,01734, 1000=0,01363, 2500=0,01239, 5000=0,01140 (USD)", RoHS=Yes, Stock 1=306728, Supplier 1=Digi-Key
C49: library part Capacitor, "CAP CER 0.068UF 16V X7R 0402", Case/Package=0402, Manufacturer=Yageo, Manufacturer Part Number=AC0402KRX7R7BB683, Max Operating Temperature=125°C, Min Operating Temperature=-55°C, Ratings=AEC-Q200, Supplier Part Number 1=311-3269-1-ND, Tolerance=10%, Voltage Rating=16V, Capacitance=68nF, Category="Ceramic Capacitors", ComponentLink1Description=http://www.yageo.com/documents/recent/UPY-AC_NP0X7R_16V-to-630V_12.pdf?src-supplier=Digi-Key, ComponentLink1URL=http://www.yageo.com/documents/recent/UPY-AC_NP0X7R_16V-to-630V_12.pdf?src-supplier=Digi-Key, ComponentLink2Description=http://www.yageo.com/documents/recent/UPY-AC_NP0X7R_16V-to-630V_11.pdf?src-supplier=Digi-Key, ComponentLink2URL=http://www.yageo.com/documents/recent/UPY-AC_NP0X7R_16V-to-630V_11.pdf?src-supplier=Digi-Key, Lead Free="Lead Free", Mount="Surface Mount", Packaging="Cut Tape", Pricing 1="1=0,10000, 10=0,06000, 50=0,03260, 100=0,02650, 500=0,01896, 1000=0,01490, 2500=0,01354, 5000=0,01246 (USD)", RoHS=No, Stock 1=93171, Supplier 1=Digi-Key
C60 C61 C63 C64 C92: library part Capacitor, "Cap Ceramic 0.001uF 25V X7R 10% SMD 0201 125°C Paper T/R", Case Code (Imperial)=0201, Case Code (Metric)=0603, Dielectric=X7R, Manufacturer=Murata, Manufacturer Part Number=GRM033R71E102KA01J, Max Operating Temperature=125°C, Min Operating Temperature=-55°C, Package Quantity=50000, Supplier Part Number 1=490-8161-1-ND, Tolerance=10%, Voltage Rating=25V, Capacitance=1nF, Case/Package=0201, Category="Ceramic Capacitors", ComponentLink1Description=https://datasheet.ciiva.com/5453/product-5453157.pdf?src-supplier=Mouser, ComponentLink1URL=https://datasheet.ciiva.com/5453/product-5453157.pdf?src-supplier=Mouser, ComponentLink2Description=https://datasheet.ciiva.com/11621/product-11621675.pdf?src-supplier=Avnet, ComponentLink2URL=https://datasheet.ciiva.com/11621/product-11621675.pdf?src-supplier=Avnet, Depth=0.3mm, Height=0.3mm, Length=0.6mm, Mount="Surface Mount", Packaging="Tape and Reel", Pricing 1="1=0,10000, 10=0,02900, 100=0,01300, 500=0,00932, 1000=0,00732, 2500=0,00666, 5000=0,00612 (USD)", Radiation Hardening=No, RoHS=Yes, Stock 1=140332, Supplier 1=Digi-Key, Termination=SMD/SMT, Thickness=0.013inch, Voltage Rating (DC)=25V, Width=0.012inch
C86 C87 C129 C141: library part Capacitor, "0603 10 uF 16 V ±10% Tolerance X5R Multilayer Ceramic Capacitor", Case Code (Imperial)=0603, Case Code (Metric)=1608, Dielectric=X5R, Manufacturer=Murata, Manufacturer Part Number=GRM188R61C106KAALJ, Max Operating Temperature=85°C, Min Operating Temperature=-55°C, Package Quantity=10000, Supplier Part Number 1=490-12736-1-ND, Tolerance=10%, Voltage Rating=16V, Capacitance=10uF, Case/Package=0603, Category="Ceramic Capacitors", ComponentLink1Description=http://www.mouser.com/ds/2/281/GRM188R61C106KAAL-01-1064790.pdf?src-supplier=Mouser, ComponentLink1URL=http://www.mouser.com/ds/2/281/GRM188R61C106KAAL-01-1064790.pdf?src-supplier=Mouser, ComponentLink2Description=http://search.murata.co.jp/Ceramy/image/img/A01X/G101/ENG/GRM188R61C106KAAL-01.pdf?src-supplier=Digi-Key, ComponentLink2URL=http://search.murata.co.jp/Ceramy/image/img/A01X/G101/ENG/GRM188R61C106KAAL-01.pdf?src-supplier=Digi-Key, Composition=Ceramic, Height=0.8mm, Length=0.063inch, Mount="Surface Mount", Packaging="Tape and Reel", Pricing 1="1=0,43000, 10=0,29900, 100=0,17910, 500=0,13434, 1000=0,11345, 2500=0,10748, 5000=0,10150 (USD)", RoHS=Yes, Stock 1=68393, Supplier 1=Digi-Key, Termination=SMD/SMT, Thickness=0.037inch, Voltage Rating (DC)=16V, Weight=0.000222oz, Width=0.031inch
C130 C142: library part Capacitor, "Multilayer Ceramic Capacitors MLCC - SMD/SMT 0.01uF 10 volts 10%", Case Code (Imperial)=0201, Case Code (Metric)=0603, Dielectric=X5R, Manufacturer=Murata, Manufacturer Part Number=GRM033R61A103KA01J, Max Operating Temperature=85°C, Min Operating Temperature=-55°C, Package Quantity=50000, Supplier Part Number 1=490-8156-1-ND, Tolerance=10%, Voltage Rating=10V, Capacitance=10nF, Case/Package=0201, Category="Ceramic Capacitors", ComponentLink1Description=https://datasheet.ciiva.com/29542/grm033r61a103ka01-01-29542528.pdf?src-supplier=Digi-Key, ComponentLink1URL=https://datasheet.ciiva.com/29542/grm033r61a103ka01-01-29542528.pdf?src-supplier=Digi-Key, ComponentLink2Description=https://datasheet.ciiva.com/11620/product-11620086.pdf?src-supplier=Avnet, ComponentLink2URL=https://datasheet.ciiva.com/11620/product-11620086.pdf?src-supplier=Avnet, ComponentLink3Description=https://datasheet.ciiva.com/29542/grm033r61a103ka01-01-29542527.pdf?src-supplier=Digi-Key, ComponentLink3URL=https://datasheet.ciiva.com/29542/grm033r61a103ka01-01-29542527.pdf?src-supplier=Digi-Key, ComponentLink4Description=https://datasheet.ciiva.com/29542/grm033r61a103ka01-01-29542526.pdf?src-supplier=Digi-Key, ComponentLink4URL=https://datasheet.ciiva.com/29542/grm033r61a103ka01-01-29542526.pdf?src-supplier=Digi-Key, Depth=0.3mm, Height=0.3mm, Lead Free="Lead Free", Length=0.6mm, Mount="Surface Mount", Packaging="Tape and Reel", Pricing 1="1=0,10000, 10=0,02900, 100=0,01300, 500=0,00932, 1000=0,00732, 2500=0,00666, 5000=0,00612 (USD)", Radiation Hardening=No, RoHS=Yes, Stock 1=128195, Supplier 1=Digi-Key, Termination=SMD/SMT, Thickness=0.013inch, Voltage Rating (DC)=10V, Width=0.012inch
C139 C140: library part Capacitor, "CAP CER 10UF 25V X5R 0805", Case Code (Imperial)=0805, Case Code (Metric)=2012, Dielectric=X5R, Dielectric Material=Ceramic, Manufacturer=KEMET, Manufacturer Part Number=C0805C106K3PACTU, Max Operating Temperature=85°C, Min Operating Temperature=-55°C, Supplier Part Number 1=399-11939-6-ND, Tolerance=10%, Voltage=25V, Capacitance=10uF, Case/Package=0805, Category="Ceramic Capacitors", ComponentLink1Description=http://www.farnell.com/datasheets/2741185.pdf?src-supplier=Farnell, ComponentLink1URL=http://www.farnell.com/datasheets/2741185.pdf?src-supplier=Farnell, ComponentLink2Description=http://www.farnell.com/datasheets/2112054.pdf?src-supplier=Farnell, ComponentLink2URL=http://www.farnell.com/datasheets/2112054.pdf?src-supplier=Farnell, ComponentLink3Description=http://www.alliedelec.com/m/d/f3c02ddb98afa3dd1adcb801109671e9.pdf?src-supplier=Allied+Electronics, ComponentLink3URL=http://www.alliedelec.com/m/d/f3c02ddb98afa3dd1adcb801109671e9.pdf?src-supplier=Allied+Electronics, ComponentLink4Description=http://www.farnell.com/datasheets/2112054.pdf?src-supplier=Element14, ComponentLink4URL=http://www.farnell.com/datasheets/2112054.pdf?src-supplier=Element14, ComponentLink5Description=https://api.kemet.com/component-edge/download/datasheet/C0805C106K3PAC7800.pdf?src-supplier=Digi-Key, ComponentLink5URL=https://api.kemet.com/component-edge/download/datasheet/C0805C106K3PAC7800.pdf?src-supplier=Digi-Key, ComponentLink6Description=http://www.kemet.com/docfinder?Partnumber=C0805C106K3PAC7800&src-supplier=Digi-Key, ComponentLink6URL=http://www.kemet.com/docfinder?Partnumber=C0805C106K3PAC7800&src-supplier=Digi-Key, ComponentLink7Description=http://www.kemet.com/Lists/ProductCatalog/Attachments/19/KEM_C1006_X5R_SMD.pdf?src-supplier=Avnet, ComponentLink7URL=http://www.kemet.com/Lists/ProductCatalog/Attachments/19/KEM_C1006_X5R_SMD.pdf?src-supplier=Avnet, Depth=1.25mm, Dissipation Factor=10%, Height=1.25mm, Lead Free="Lead Free", Length=0.079inch, Mount="Surface Mount", Packaging="Cut Tape", Pricing 1="1=0,24000, 10=0,16800, 100=0,09510, 500=0,06710, 1000=0,05872 (USD)", REACH SVHC="No SVHC", RoHS=Yes, Stock 1=4800, Supplier 1=Digi-Key, Termination=Solder, Thickness=0.057inch, Voltage Rating=25V, Voltage Rating (DC)=25V, Width=0.049inch
C151 C152: library part Capacitor, "CAP CER 0.1UF 50V X5R 0402", Case Code (Imperial)=0402, Case Code (Metric)=1005, Dielectric=X5R, Dielectric Material=Ceramic, Manufacturer=Murata, Manufacturer Part Number=GRM155R61H104KE14D, Max Operating Temperature=85°C, Min Operating Temperature=-55°C, Package Quantity=10000, Supplier Part Number 1=490-10697-1-ND, Tolerance=10%, Voltage=50V, Capacitance=100nF, Case/Package=0402, Category="Ceramic Capacitors", ComponentLink1Description=http://www.farnell.com/datasheets/2079150.pdf?src-supplier=Farnell, ComponentLink1URL=http://www.farnell.com/datasheets/2079150.pdf?src-supplier=Farnell, ComponentLink2Description=http://www.mouser.com/ds/2/281/c02e-2905.pdf?src-supplier=Mouser, ComponentLink2URL=http://www.mouser.com/ds/2/281/c02e-2905.pdf?src-supplier=Mouser, ComponentLink3Description=http://www.farnell.com/datasheets/2079150.pdf?src-supplier=Element14, ComponentLink3URL=http://www.farnell.com/datasheets/2079150.pdf?src-supplier=Element14, ComponentLink4Description=http://search.murata.co.jp/Ceramy/image/img/A01X/G101/ENG/GRM155R61H104KE14-01.pdf?src-supplier=Digi-Key, ComponentLink4URL=http://search.murata.co.jp/Ceramy/image/img/A01X/G101/ENG/GRM155R61H104KE14-01.pdf?src-supplier=Digi-Key, Composition=Ceramic, Depth=0.5mm, Dissipation Factor=0.025%, Height=0.5mm, Lead Free="Lead Free", Length=1mm, Mount="Surface Mount", Packaging="Tape and Reel", Pricing 1="1=0,10000, 10=0,04600, 100=0,02050, 500=0,01464, 1000=0,01150, 2500=0,01045, 5000=0,00961 (USD)", REACH SVHC="No SVHC", RoHS=Yes, Stock 1=435607, Supplier 1=Digi-Key, Termination=SMD/SMT, Thickness=0.022inch, Voltage Rating=50V, Voltage Rating (DC)=50V, Weight=0.000212oz, Width=0.02inch
C156 C158 C159_U_RF_ANT_L C159_U_RF_ANT_M C160_U_RF_ANT_L C160_U_RF_ANT_M C164 C173 C175 C178: library part Capacitor, "CAP CER 120PF 25V C0G/NP0 0402", Case Code (Imperial)=0402, Case Code (Metric)=1005, Manufacturer=KEMET, Manufacturer Part Number=C0402C121J3GAC7867, Max Operating Temperature=125°C, Min Operating Temperature=-55°C, Supplier Part Number 1=399-14880-1-ND, Tolerance=5%, Voltage Rating=25V, Capacitance=120pF, Case/Package=0402, Category="Ceramic Capacitors", ComponentLink1Description=https://api.kemet.com/component-edge/download/datasheet/C0402C121J3GAC7867.pdf?src-supplier=Digi-Key, ComponentLink1URL=https://api.kemet.com/component-edge/download/datasheet/C0402C121J3GAC7867.pdf?src-supplier=Digi-Key, Mount="Surface Mount", Packaging="Tape and Reel", Pricing 1="1=0,10000, 10=0,04100, 50=0,02260, 100=0,01840, 500=0,01312, 1000=0,01032, 2500=0,00938, 5000=0,00863 (USD)", RoHS=No, Stock 1=43311, Supplier 1=Digi-Key
C161 C162 C171 C172: library part Capacitor, "Multilayer Ceramic Capacitors MLCC - SMD/SMT 0603 8,200pF 50volts C0G +/-5%", Case Code (Imperial)=0603, Case Code (Metric)=1608, Dielectric=C0G, Manufacturer=Murata, Manufacturer Part Number=GRM1885C1H822JA01D, Max Operating Temperature=125°C, Min Operating Temperature=-55°C, Package Quantity=4000, Supplier Part Number 1=490-11482-1-ND, Tolerance=5%, Voltage Rating=50V, Capacitance=8.2nF, Case/Package=0603, Category="Ceramic Capacitors", ComponentLink1Description=https://datasheet.ciiva.com/29537/partnumbering-e-01-29537913.pdf?src-supplier=Digi-Key, ComponentLink1URL=https://datasheet.ciiva.com/29537/partnumbering-e-01-29537913.pdf?src-supplier=Digi-Key, Height=0.8mm, Length=0.063inch, Mount="Surface Mount", Packaging="Tape and Reel", Pricing 1="1=0,21000, 10=0,14200, 50=0,08500, 100=0,07170, 500=0,04908, 1000=0,04341 (USD)", RoHS=Yes, Stock 1=65615, Supplier 1=Digi-Key, Termination=SMD/SMT, Thickness=0.035inch, Voltage Rating (DC)=50V, Width=0.031inch
C163 C169 C186_U_RF_ANT_L C186_U_RF_ANT_M C187_U_RF_ANT_L C187_U_RF_ANT_M C188 C190: library part Capacitor, "Multilayer Ceramic Capacitors MLCC - SMD/SMT 0201 100pF 25volts C0G +/-5%", Case Code (Imperial)=0201, Case Code (Metric)=0603, Dielectric=C0G, Manufacturer=Murata, Manufacturer Part Number=GRM0335C1E101JA01D, Max Operating Temperature=125°C, Min Operating Temperature=-55°C, Package Quantity=15000, Supplier Part Number 1=490-3160-1-ND, Tolerance=5%, Voltage=25V, Capacitance=100pF, Case/Package=0201, Category="Ceramic Capacitors", ComponentLink1Description=https://datasheet.ciiva.com/16497/grm0335c1e101ja01-01-16497112.pdf?src-supplier=Future+Electronics, ComponentLink1URL=https://datasheet.ciiva.com/16497/grm0335c1e101ja01-01-16497112.pdf?src-supplier=Future+Electronics, ComponentLink2Description=https://datasheet.ciiva.com/18697/product-18697797.pdf?src-supplier=Digi-Key, ComponentLink2URL=https://datasheet.ciiva.com/18697/product-18697797.pdf?src-supplier=Digi-Key, Depth=0.3mm, Height=0.3mm, Lead Free="Lead Free", Length=0.6mm, Mount="Surface Mount", Packaging="Tape and Reel", Pricing 1="1=0,10000, 10=0,01300, 100=0,00560, 500=0,00400, 1000=0,00315, 2500=0,00286, 5000=0,00263 (USD)", Radiation Hardening=No, REACH SVHC="No SVHC", RoHS=Yes, Stock 1=270262, Supplier 1=Digi-Key, Termination=SMD/SMT, Thickness=0.013inch, Voltage Rating=25V, Voltage Rating (DC)=25V, Width=0.012inch
C165 C176: library part Capacitor, "SMT Capacitor", Part Number=0603ZD225MAT2A, Supplier Part Number 1=478-7941-1-ND, Supplier 1=Digi-Key
C167: library part Capacitor, "CERAMIC CAPACITOR, 82PF, 25V, C0G/NP0, 0402; Product Range:VJ HIFREQ Series; Capacitance:82pF; Capacitance Tolerance: 5%; Dielectric Characteristic:C0G / NP0; Voltage Rating:25V; Ceramic Capacitor Case:0402 [1005 Metric] ;RoHS Compliant: Yes", Case Code (Imperial)=0402, Case Code (Metric)=1005, Dielectric=C0G, Manufacturer="Vishay Vitramon", Manufacturer Part Number=VJ0402D820JXXAJ, Max Operating Temperature=125°C, Min Operating Temperature=-55°C, Package Quantity=1, Supplier Part Number 1=720-1297-1-ND, Temperature Coefficient=30ppm/°C, Tolerance=5%, Voltage=25V, Capacitance=82pF, Case/Package=0402, Category="Ceramic Capacitors", ComponentLink1Description=https://datasheet.ciiva.com/30503/0900766b812428e7-30503890.pdf?src-supplier=RSComponents, ComponentLink1URL=https://datasheet.ciiva.com/30503/0900766b812428e7-30503890.pdf?src-supplier=RSComponents, ComponentLink2Description=https://datasheet.ciiva.com/16511/vj0402dseries-16511415.pdf?src-supplier=Future+Electronics, ComponentLink2URL=https://datasheet.ciiva.com/16511/vj0402dseries-16511415.pdf?src-supplier=Future+Electronics, ComponentLink3Description=https://datasheet.ciiva.com/6286/vjhifreq-6286552.pdf?src-supplier=Digi-Key, ComponentLink3URL=https://datasheet.ciiva.com/6286/vjhifreq-6286552.pdf?src-supplier=Digi-Key, ComponentLink4Description=https://datasheet.ciiva.com/7974/1631376-7974937.pdf?src-supplier=Element14, ComponentLink4URL=https://datasheet.ciiva.com/7974/1631376-7974937.pdf?src-supplier=Element14, ComponentLink5Description=https://datasheet.ciiva.com/6286/vjhifreq-6286555.pdf?src-supplier=Digi-Key, ComponentLink5URL=https://datasheet.ciiva.com/6286/vjhifreq-6286555.pdf?src-supplier=Digi-Key, ComponentLink6Description=https://datasheet.ciiva.com/49031/70396551-49031980.pdf?src-supplier=Allied+Electronics, ComponentLink6URL=https://datasheet.ciiva.com/49031/70396551-49031980.pdf?src-supplier=Allied+Electronics, ComponentLink7Description=https://datasheet.ciiva.com/6286/vjhifreq-6286558.pdf?src-supplier=Digi-Key, ComponentLink7URL=https://datasheet.ciiva.com/6286/vjhifreq-6286558.pdf?src-supplier=Digi-Key, Depth=0.51mm, Height=0.61mm, Lead Free="Lead Free", Length=1.02mm, Mount="Surface Mount,PCB", Packaging="Tape and Reel", Pricing 1="1=0,52000, 10=0,36500, 50=0,27620, 100=0,24060, 500=0,17820 (USD)", Radiation Hardening=No, REACH SVHC=Unknown, RoHS=Yes, Stock 1=90328, Supplier 1=Digi-Key, Termination=SMD/SMT, Thickness=0.024inch, Voltage Rating=25V, Voltage Rating (DC)=25V, Weight=2.3E-05oz, Width=0.51mm
C168: library part Capacitor, "KEMET - CBR04C100F5GAC - Capacitor, RF, 10 pF, 50 V, HiQ-CBR Series, ± 1%, 125 °C, 0402 [1005 Metric]", Case Code (Imperial)=0402, Case Code (Metric)=1005, Dielectric=C0G, Manufacturer=KEMET, Manufacturer Part Number=CBR04C100F5GAC, Max Operating Temperature=125°C, Min Operating Temperature=-55°C, Package Quantity=10000, Supplier Part Number 1=399-8805-1-ND, Tolerance=1%, Voltage Rating=50V, Capacitance=10pF, Case/Package=0402, Category="Ceramic Capacitors", ComponentLink1Description=https://datasheet.ciiva.com/6276/kem-c1030-cbr-smd-6276869.pdf?src-supplier=Digi-Key, ComponentLink1URL=https://datasheet.ciiva.com/6276/kem-c1030-cbr-smd-6276869.pdf?src-supplier=Digi-Key, ComponentLink2Description=https://datasheet.ciiva.com/6276/kem-c1030-cbr-smd-6276872.pdf?src-supplier=Digi-Key, ComponentLink2URL=https://datasheet.ciiva.com/6276/kem-c1030-cbr-smd-6276872.pdf?src-supplier=Digi-Key, ComponentLink3Description=https://datasheet.ciiva.com/6276/kem-c1030-cbr-smd-6276875.pdf?src-supplier=Digi-Key, ComponentLink3URL=https://datasheet.ciiva.com/6276/kem-c1030-cbr-smd-6276875.pdf?src-supplier=Digi-Key, Length=0.039inch, Mount="Surface Mount", Packaging="Cut Tape", Pricing 1="1=0,23000, 10=0,15500, 50=0,09300, 100=0,07860, 500=0,05376, 1000=0,04756, 2500=0,04550, 5000=0,04136 (USD)", REACH SVHC="No SVHC", RoHS=Yes, Stock 1=134697, Supplier 1=Digi-Key, Thickness=0.022inch, Voltage Rating (DC)=50V, Width=0.02inch
C182_U_ATT1 C182_U_ATT2 C183_U_ATT1 C183_U_ATT2 C184_U_ATT1 C184_U_ATT2 C185_U_ATT1 C185_U_ATT2: library part Capacitor, Case/Package=0402, Dielectric=C0G, Manufacturer 1="Walsin Technologies", Manufacturer Part Number 1=0402N331F500CT, Max Operating Temperature=125°C, Min Operating Temperature=-55°C, Supplier Part Number 1=1292-1307-1-ND, Tolerance=1%, Capacitance=330pF, ComponentLink1Description=http://components.arrow.com/part/dataview/0323_06535843?src-supplier=Arrow+Europe, ComponentLink1URL=http://components.arrow.com/part/dataview/0323_06535843?src-supplier=Arrow+Europe, ComponentLink2Description=http://www.passivecomponent.com/indexsea/0402N331F500CT-IN.pdf?src-supplier=Digi-Key, ComponentLink2URL=http://www.passivecomponent.com/indexsea/0402N331F500CT-IN.pdf?src-supplier=Digi-Key, Depth=0.5mm, Length=1mm, Packaging="Tape and Reel", Pricing 1="1=0.12000, 10=0.09000, 100=0.04030, 500=0.02876, 1000=0.02260, 2500=0.02054, 5000=0.01890 (USD)", RoHS=Yes, Stock 1=23341, Supplier 1=Digi-Key
D7_U_RF_ANT_L D7_U_RF_ANT_M: Supplier Part Number 1=1465-1738-1-ND, Part Number=MADP-011029-14150T, Supplier 1=Digi-Key
D8_U_RF_ANT_L D8_U_RF_ANT_M: Supplier Part Number 1=1465-1736-6-ND, Supplier 1=Digi-Key
D9 D10 D11 D12 D13: "LED,  LTST-C190GKT", Case Code (Imperial)=0603, Case Code (Metric)=1608, Color=Green, Forward Current=30mA, Forward Voltage=2.1V, Lens Color=Colorless, Manufacturer 1="Vishay Lite-On", Max Operating Temperature=85°C, Min Operating Temperature=-55°C, Package Quantity=1, Power Dissipation=100mW, Reverse Voltage=5V, Supplier Part Number 1=160-1183-1-ND, Test Current=10mA, Voltage=2V, Case/Package=0603, ComponentLink1Description=https://datasheet.ciiva.com/11775/0900766b80dc02a6-11775616.pdf?src-supplier=RSComponents, ComponentLink1URL=https://datasheet.ciiva.com/11775/0900766b80dc02a6-11775616.pdf?src-supplier=RSComponents, ComponentLink2Description=https://datasheet.ciiva.com/2109/ltst-c190gkt-2109985.pdf?src-supplier=Digi-Key, ComponentLink2URL=https://datasheet.ciiva.com/2109/ltst-c190gkt-2109985.pdf?src-supplier=Digi-Key, ComponentLink3Description=https://datasheet.ciiva.com/16392/lite-on20ltst-c190gkt-16392818.pdf?src-supplier=Future+Electronics, ComponentLink3URL=https://datasheet.ciiva.com/16392/lite-on20ltst-c190gkt-16392818.pdf?src-supplier=Future+Electronics, ComponentLink4Description=https://datasheet.ciiva.com/12403/lite-on-ltst-c190gkt-187204-12403884.pdf?src-supplier=Mouser, ComponentLink4URL=https://datasheet.ciiva.com/12403/lite-on-ltst-c190gkt-187204-12403884.pdf?src-supplier=Mouser, ComponentLink5Description=https://datasheet.ciiva.com/2109/ltst-c190gkt-2109986.pdf?src-supplier=Digi-Key, ComponentLink5URL=https://datasheet.ciiva.com/2109/ltst-c190gkt-2109986.pdf?src-supplier=Digi-Key, ComponentLink6Description=https://datasheet.ciiva.com/2109/ltst-c190gkt-2109987.pdf?src-supplier=Digi-Key, ComponentLink6URL=https://datasheet.ciiva.com/2109/ltst-c190gkt-2109987.pdf?src-supplier=Digi-Key, Depth=0.8mm, Dominant Wavelength=569nm, Height=0.8mm, Illumination Color=Green, Lead Free="Lead Free", Length=1.6mm, Lens Style=Clear,Diffused,Colorless,Rectangular, Lens Transparency=Clear, Luminous Intensity=6mcd, Manufacturer Part Number 1=LTST-C190GKT, Mount="Surface Mount", Number of Elements=1, Number of LEDs=1, Number of Pins=2, Packaging="Tape and Reel", Power Rating=100mW, Pricing 1="1=0.26000, 10=0.18800, 100=0.08880, 500=0.05922, 1000=0.04639 (USD)", Radiation Hardening=No, RoHS=Yes, Stock 1=908158, Supplier 1=Digi-Key, Viewing Angle=130°, Wavelength=565nm, Width=0.8mm
FB1 FB2 FB15 FB30 FB31 FB32 FB33 FB34: library part Ferrite, Case Code (Imperial)=0603, Case Code (Metric)=1608, Current Rating=2A, DC Resistance (DCR)=45mR, Manufacturer 1=TDK, Manufacturer Part Number 1=MPZ1608S121ATAH0, Package Quantity=4000, Supplier Part Number 1=445-5219-1-ND, Tolerance=25%, Case/Package=0603, ComponentLink1Description=https://datasheet.ciiva.com/46634/beads-commercial-power-mpz-en-46634726.pdf?src-supplier=Digi-Key, ComponentLink1URL=https://datasheet.ciiva.com/46634/beads-commercial-power-mpz-en-46634726.pdf?src-supplier=Digi-Key, ComponentLink2Description=https://datasheet.ciiva.com/46634/beads-commercial-power-mpz-en-46634728.pdf?src-supplier=Digi-Key, ComponentLink2URL=https://datasheet.ciiva.com/46634/beads-commercial-power-mpz-en-46634728.pdf?src-supplier=Digi-Key, ComponentLink3Description=https://datasheet.ciiva.com/48682/beads-commercial-power-mpz-en-48682494.pdf?src-supplier=Avnet, ComponentLink3URL=https://datasheet.ciiva.com/48682/beads-commercial-power-mpz-en-48682494.pdf?src-supplier=Avnet, Core Material=Ferrite, Depth=0.8mm, Height=0.03inch, Impedance=120R, Length=0.063inch, Max DC Current=2A, Mount="Surface Mount", Packaging="Tape and Reel", Pricing 1="1=0.10000, 10=0.07900, 25=0.07160, 50=0.06440, 100=0.04720, 250=0.03432, 500=0.03146, 1000=0.02717 (USD)", RoHS=Yes, Stock 1=68096, Supplier 1=Digi-Key, Width=0.031inch
FB6 FB22 FB23 FB24 FB25 FB26 FB27: library part Ferrite, "FERRITE BEAD 120 OHM 0402 1LN", Case Code (Imperial)=0402, Case Code (Metric)=1005, Current Rating=300mA, DC Resistance (DCR)=550mR, Frequency=100MHz, Manufacturer=Murata, Manufacturer Part Number=BLM15BB121SN1D, Max Operating Temperature=125°C, Min Operating Temperature=-55°C, Package Quantity=1, Resistor Type="Ferrite Bead", Supplier Part Number 1=490-1008-1-ND, Tolerance=25%, Case/Package=0402, Category=Inductors, ComponentLink1Description=https://datasheet.ciiva.com/1466/5145-1466832.pdf?src-supplier=Element14, ComponentLink1URL=https://datasheet.ciiva.com/1466/5145-1466832.pdf?src-supplier=Element14, ComponentLink2Description=https://datasheet.ciiva.com/41449/001172179-da-01-en-drossel-0402-120r-1-0x0-5mm-10000st-41449466.pdf?src-supplier=Conrad, ComponentLink2URL=https://datasheet.ciiva.com/41449/001172179-da-01-en-drossel-0402-120r-1-0x0-5mm-10000st-41449466.pdf?src-supplier=Conrad, ComponentLink3Description=https://datasheet.ciiva.com/1466/5145-1466833.pdf?src-supplier=Element14, ComponentLink3URL=https://datasheet.ciiva.com/1466/5145-1466833.pdf?src-supplier=Element14, ComponentLink4Description=https://datasheet.ciiva.com/3082/l0110s0100blm15b-3082680.pdf?src-supplier=Avnet, ComponentLink4URL=https://datasheet.ciiva.com/3082/l0110s0100blm15b-3082680.pdf?src-supplier=Avnet, ComponentLink5Description=https://datasheet.ciiva.com/16213/l0110s0100blm15b-16213674.pdf?src-supplier=Future+Electronics, ComponentLink5URL=https://datasheet.ciiva.com/16213/l0110s0100blm15b-16213674.pdf?src-supplier=Future+Electronics, ComponentLink6Description=https://datasheet.ciiva.com/1012/l0110s0100blm15b-1012029.pdf?src-supplier=Digi-Key, ComponentLink6URL=https://datasheet.ciiva.com/1012/l0110s0100blm15b-1012029.pdf?src-supplier=Digi-Key, ComponentLink7Description=https://datasheet.ciiva.com/1012/l0110s0100blm15b-1012030.pdf?src-supplier=Digi-Key, ComponentLink7URL=https://datasheet.ciiva.com/1012/l0110s0100blm15b-1012030.pdf?src-supplier=Digi-Key, ComponentLink8Description=https://datasheet.ciiva.com/1012/l0110s0100blm15b-1012031.pdf?src-supplier=Digi-Key, ComponentLink8URL=https://datasheet.ciiva.com/1012/l0110s0100blm15b-1012031.pdf?src-supplier=Digi-Key, Core Material=Ferrite, Depth=0.5mm, Height=0.5mm, Impedance=120R, Lead Free="Lead Free", Length=1mm, Material=Ferrite,Steel, Max Current Rating=300mA, Max DC Current=300mA, Number of Circuits=1, Number of Lines=1, Number of Pins=2, Packaging="Tape and Reel", Pricing 1="1=0,10000, 10=0,08300, 25=0,07440, 50=0,05440, 100=0,04700, 250=0,03712, 500=0,03136, 1000=0,02640, 5000=0,02351 (USD)", REACH SVHC="No SVHC", RoHS=Yes, Shielding=Unshielded, Stock 1=72662, Supplier 1=Digi-Key, Termination=SMD/SMT, Test Frequency=100MHz, Width=0.5mm